# Altium PCB PS-25-001-E-01.PcbDoc (part 3 of 3)
Units mm, origin at the board's own origin, x right, y up, seen from the top; angles counter-clockwise.
Board outline 120 x 60 mm, 4 copper layers (01_Top, 02_Plane, 03_Plane, 04_Bottom), stack 1.578 mm thick; 526 components, 249 nets, 1738 pads, 748 vias.
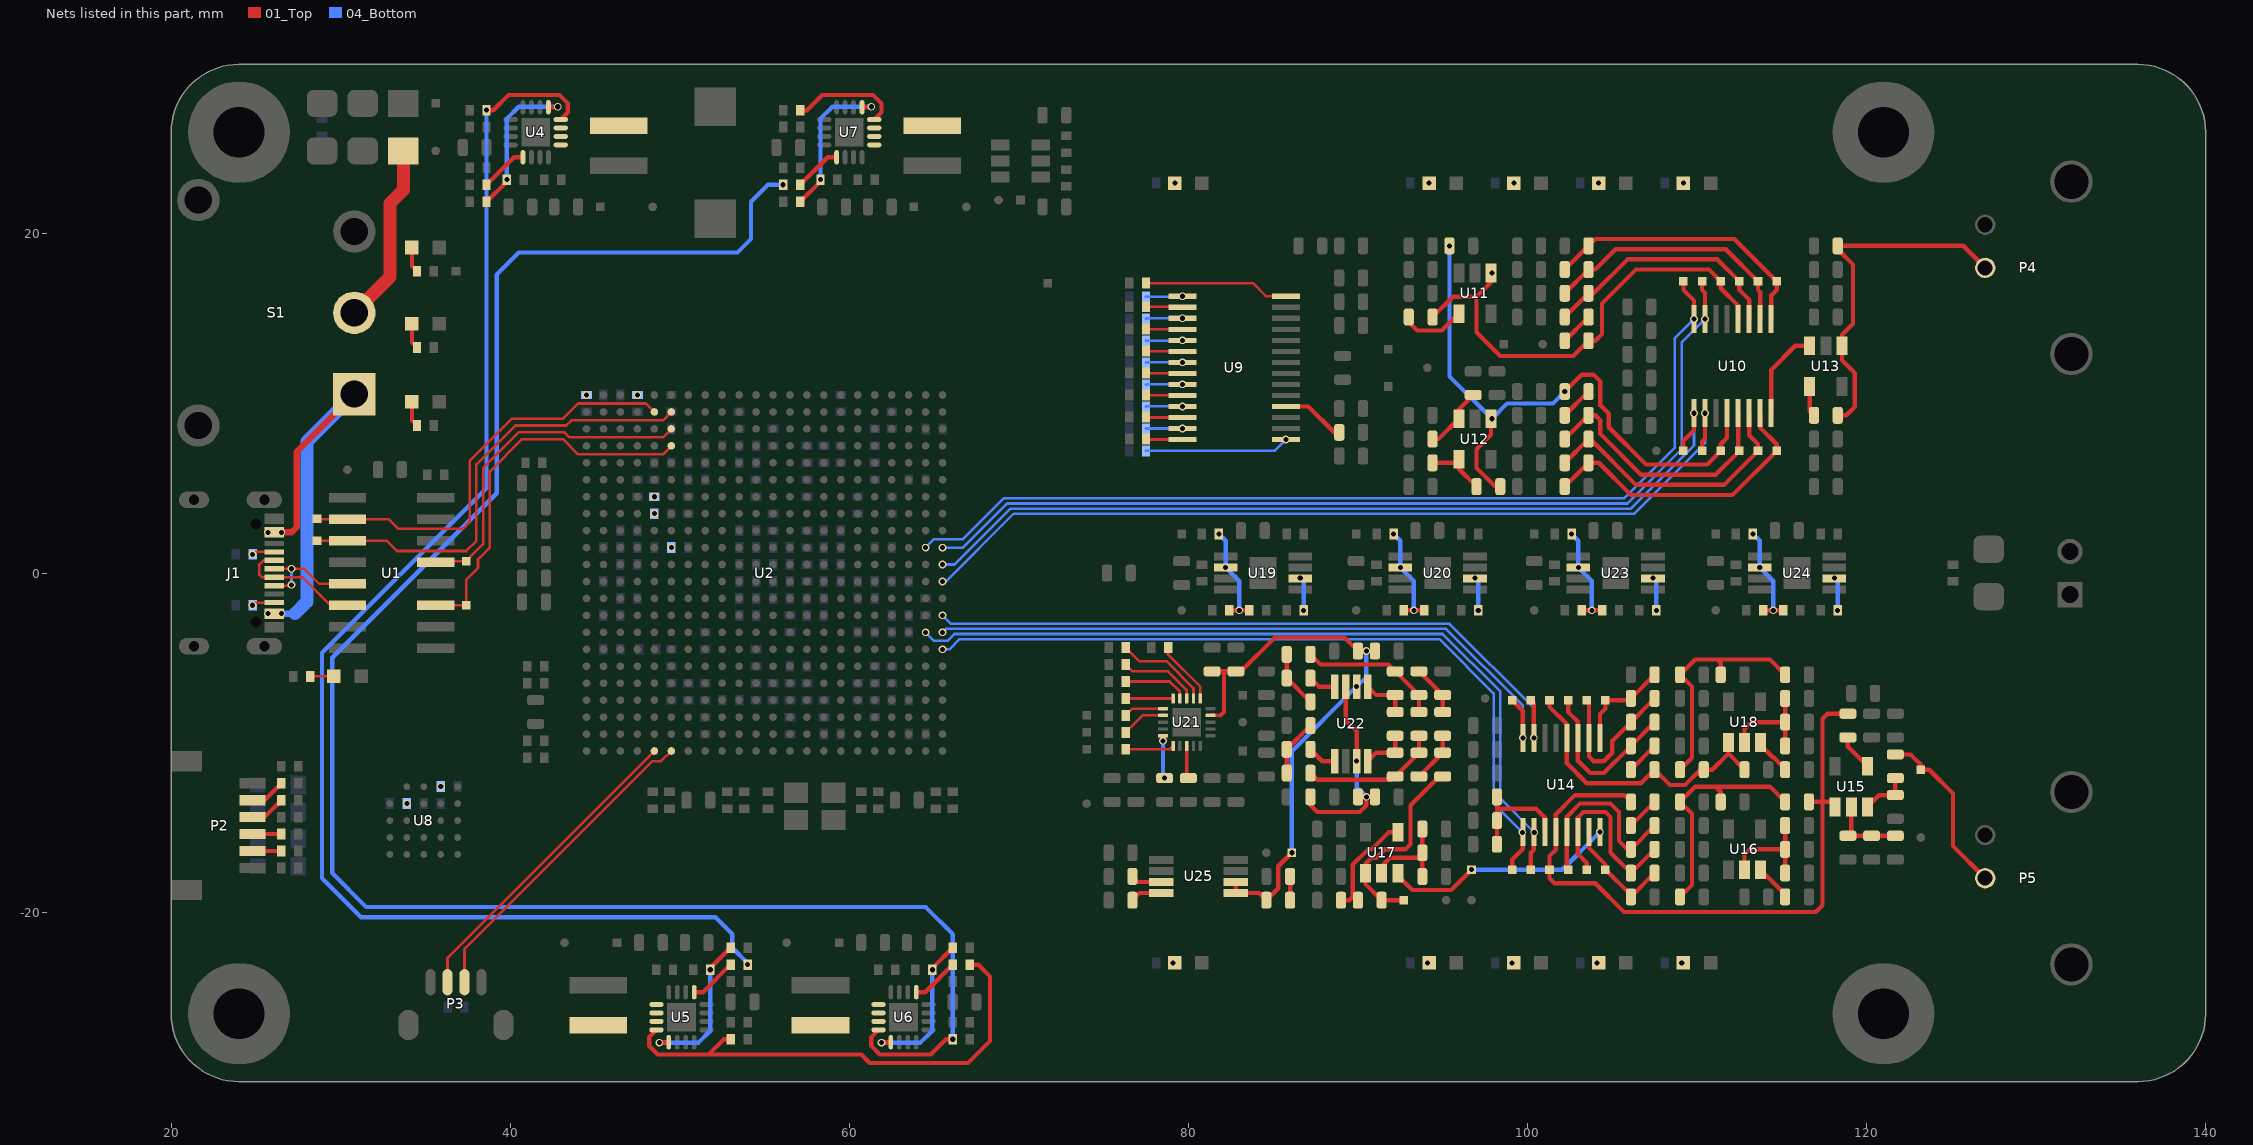
[diagram p5: the nets of this part, all layers, seen from the top]

## Via types
v1: diameter 0.45, hole 0.3, 01_Top to 04_Bottom, tented both sides, 728 vias
v2: diameter 0.4, hole 0.3, 01_Top to 04_Bottom, tented bottom, 20 vias

## Nets (pads, with @x,y where several pads share a name; then routed paths per layer and width w, separated by ;. In a path a pad name is that pad's centre, name@x,y a point inside that pad or via, vN(x,y) a via of type N, cw(c..) or ccw(c..) an arc to the next point about the centre after c; other vN are vias at no path point) (continued)
NetC177_2: C177.2 C178.1 R110.1 U14.3 | length 6.7
  01_Top w0.254: R110.1@98.2,-16 C178.1@98.2,-14.6 98.2,-13.9 ; C177.2@98.2,-13.2 98.2,-13.9 ; U14.3@101.025,-15.275 101.025,-14.425 100.5,-13.9 98.2,-13.9
NetC180_2: C180.2 R101.2 R111.1 R112.2 | length 14.1
  01_Top w0.254: R101.2@109,-19.1 109.7,-18.4 109.7,-14.2 C180.2@109,-13.5 109.9,-12.6 111.1,-12.6 ; R112.2@111.4,-13.5 111.4,-12.9 111.1,-12.6 ; R111.1@115.2,-13.5 114.3,-12.6 111.1,-12.6
NetC181_1: C181.1 R114.1 U15.3 | length 2.9
  01_Top w0.254: U15.3@120.05,-13.8 120.75,-13.1 C181.1@121.7,-13.1 R114.1@121.7,-12.1
NetC182_2: C182.2 R103.2 R116.1 R117.2 | length 14.1
  01_Top w0.254: R103.2@109,-11.6 109.7,-10.9 109.7,-6.7 C182.2@109,-6 109.9,-5.1 111.2,-5.1 ; R117.2@111.4,-6 111.4,-5.3 111.2,-5.1 ; R116.1@115.2,-6 114.3,-5.1 111.2,-5.1
NetC183_2: C183.2 C186.1 R127.2 U15.2 | length 4.6
  01_Top w0.254: U15.2@119.1,-13.8 119.1,-15.3 C183.2@118.9,-15.5 C186.1@120.3,-15.5 R127.2@121.7,-15.5
NetC184_2: C184.2 C188.1 R130.2 U17.2 | length 5.9
  01_Top w0.254: U17.2@91.4,-17.7 91.4,-17.3 91.9,-16.8 93.5,-16.8 C188.1@93.8,-16.5 ; C184.2@93.8,-17.9 C188.1@93.8,-16.5 ; R130.2@93.8,-15.1 C188.1@93.8,-16.5
NetC185_2: C185.2 C189.1 R129.2 U16.2 | length 6.2
  01_Top w0.254: U16.2@112.8,-17.5 112.8,-16.6 113.1,-16.3 C185.2@115.2,-16.3 ; C189.1@115.2,-17.7 C185.2@115.2,-16.3 ; R129.2@115.2,-14.9 C185.2@115.2,-16.3
NetC187_2: C187.2 C190.1 R132.2 U18.2 | length 6.2
  01_Top w0.254: U18.2@112.8,-10 112.8,-9.2 113.2,-8.8 C187.2@115.2,-8.8 ; C190.1@115.2,-10.2 C187.2@115.2,-8.8 ; R132.2@115.2,-7.4 C187.2@115.2,-8.8
NetC191_1: C191.1 C192.1 R134.2 U22.3 U22.7 | length 12.7
  01_Top w0.254: R134.2@87.2,-13.2 87.2,-13.7 87.6,-14.1 90.1,-14.1 90.5,-13.7 v1(90.5,-13.2) ; U22.3@89.275,-6.7 89.275,-8.675 89.925,-9.325 v1(89.925,-11.1) ; C191.1@89.925,-13.125 C191.1@90,-13.2 v1(90.5,-13.2) ; C192.1@91,-13.2 v1(90.5,-13.2)
  04_Bottom w0.254: v1(89.925,-11.1) 89.925,-12.625 v1(90.5,-13.2)
NetC202_1: C202.1 R140.1 R142.2 U19.2 | length 6.2
  01_Top w0.254: R140.1@82.4,-2.2 R142.2@83.6,-2.2
  04_Bottom w0.254: v1(81.8,2.3) 82.2,1.9 v1(82.2,0.325) 83,-0.475 v1(83,-2.2)
NetC203_1: C203.1 R141.1 R143.2 U20.2 | length 6.2
  01_Top w0.254: R141.1@92.7,-2.2 R143.2@93.9,-2.2
  04_Bottom w0.254: v1(92.1,2.3) 92.5,1.9 v1(92.5,0.325) 93.3,-0.475 v1(93.3,-2.2)
NetC204_1: C204.1 R135.2 R136.1 | length 3
  01_Top w0.254: R136.1@93.6,-5.8 R135.2@95,-7.2 C204.1@95,-8.2
NetC204_2: C204.2 R146.2 R147.1 | length 3
  01_Top w0.254: R147.1@93.6,-12 R146.2@95,-10.6 C204.2@95,-9.6
NetC205_1: C205.1 R133.1 R136.2 R137.1 | length 8.4
  01_Top w0.254: R133.1@87.2,-4.8 87.8,-5.4 91.8,-5.4 R136.2@93.6,-7.2 C205.1@93.6,-8.2
NetC205_2: C205.2 R147.2 R148.1 R149.1 | length 8.2
  01_Top w0.254: R149.1@87.2,-11.8 87.6,-12.2 92,-12.2 R148.1@92.2,-12 R147.2@93.6,-10.6 C205.2@93.6,-9.6
NetC206_1: C206.1 R137.2 U22.1 | length 2.8
  01_Top w0.254: U22.1@90.575,-6.7 91.075,-7.2 R137.2@92.2,-7.2 C206.1@92.2,-8.2
NetC206_2: C206.2 R148.2 U22.8 | length 2.8
  01_Top w0.254: U22.8@90.575,-11.1 91.075,-10.6 R148.2@92.2,-10.6 C206.2@92.2,-9.6
NetC211_2: C211.2 U19.6 | length 2
  01_Top w0.254: U19.6@86.6,-0.325 v1(86.6,-0.3)
  04_Bottom w0.254: v1(86.6,-0.3) 86.8,-0.5 v1(86.8,-2.2)
NetC212_2: C212.2 U20.6 | length 2
  01_Top w0.254: U20.6@96.9,-0.325 v1(96.9,-0.3)
  04_Bottom w0.254: v1(96.9,-0.3) 97.1,-0.5 v1(97.1,-2.2)
NetC217_2: C217.2 U21.18 | length 1.9
  01_Top w0.203: C217.2@79.9,-12 U21.18@79.9,-10.2
  01_Top w0.254: C217.2@79.9,-12 C217.2@80,-12.1
NetC218_2: C218.2 U21.15 | length 2.5
  01_Top w0.203: v1(78.5,-9.9) U21.15@78.5,-9.6
  04_Bottom w0.254: v1(78.5,-9.9) 78.5,-12 v1(78.6,-12.1)
NetC227_1: C227.1 R154.1 R158.2 U23.2 | length 6.2
  01_Top w0.254: R154.1@103.2,-2.2 R158.2@104.4,-2.2
  04_Bottom w0.254: v1(102.6,2.3) 103,1.9 v1(103,0.325) 103.8,-0.475 v1(103.8,-2.2)
NetC228_1: C228.1 R155.1 R159.2 U24.2 | length 6.2
  01_Top w0.254: R155.1@113.9,-2.2 R159.2@115.1,-2.2
  04_Bottom w0.254: v1(113.3,2.3) 113.7,1.9 v1(113.7,0.325) 114.5,-0.475 v1(114.5,-2.2)
NetC231_2: C231.2 U23.6 | length 2
  01_Top w0.254: U23.6@107.4,-0.325 v1(107.4,-0.3)
  04_Bottom w0.254: v1(107.4,-0.3) 107.6,-0.5 v1(107.6,-2.2)
NetC232_2: C232.2 U24.6 | length 2
  01_Top w0.254: U24.6@118.1,-0.325 v1(118.1,-0.3)
  04_Bottom w0.254: v1(118.1,-0.3) 118.3,-0.5 v1(118.3,-2.2)
NetC233_1: C233.1 R162.1 | length 1.4
  01_Top w0.254: R162.1@86,-19.3 C233.1@86,-17.9
NetC235_1: C235.1 U25.4 | length 1.9
  01_Top w0.254: C235.1@76.7,-19.3 77.125,-18.875 U25.4@78.4,-18.875
NetD1_1: D1.1 R8.1 | length 1.5
  01_Top w0.254: D1.1@34.2,10.1 34.2,9 R8.1@34.5,8.7
NetD2_1: D2.1 R6.1
  other v1: 79.2,23
NetD3_1: D3.1 R7.1
  other v1: 79.1,-23
NetD4_1: D4.1 R10.1
  other v1: 94.2,23
NetD5_1: D5.1 R11.1
  other v1: 94.1,-23
NetD6_1: D6.1 R13.1 | length 1.4
  01_Top w0.152: R13.1@28.2,-6.1 D6.1@29.6,-6.1
NetD7_1: D7.1 R14.1
  other v1: 99.2,23
NetD8_1: D8.1 R15.1
  other v1: 99.1,-23
NetD9_1: D9.1 R16.1 | length 1.5
  01_Top w0.254: D9.1@34.2,14.7 34.2,13.6 R16.1@34.5,13.3
NetD10_1: D10.1 R17.1
  other v1: 104.2,23
NetD11_1: D11.1 R18.1
  other v1: 104.1,-23
NetD12_1: D12.1 R22.1 | length 1.5
  01_Top w0.254: D12.1@34.2,19.2 34.2,18.1 R22.1@34.5,17.8
NetD13_1: D13.1 R20.1
  other v1: 109.2,23
NetD14_1: D14.1 R21.1
  other v1: 109.1,-23
NetF1_1: F1.1 S1.2 | length 10.8
  01_Top w0.762: S1.2@30.8,15.35 32.9,17.45 32.9,21.8 33.7,22.6 F1.1@33.7,24.9
NetJ1_A5: J1.A5 R1.1 | length 1.3
  01_Top w0.152: v1(24.8,1.1) 24.95,1.25 J1.A5@26.075,1.25
NetJ1_B5: J1.B5 R2.2 | length 1.3
  01_Top w0.152: v1(24.8,-1.9) 24.95,-1.75 J1.B5@26.075,-1.75
NetL1_1: L1.1 U4.1 U4.2 U4.3
NetL2_1: L2.1 U5.1 U5.2 U5.3
NetL3_1: L3.1 U6.1 U6.2 U6.3
NetL4_1: L4.1 U7.1 U7.2 U7.3
NetP2_2: P2.2 R27.1 | length 2.1
  01_Top w0.254: P2.2@24.8,-13.4 25.5,-13.4 R27.1@26.5,-12.4
NetP2_3: P2.3 R28.1 | length 2.1
  01_Top w0.254: P2.3@24.8,-14.4 25.5,-14.4 R28.1@26.5,-13.4
NetP2_4: P2.4 R29.1 | length 1.7
  01_Top w0.254: P2.4@24.8,-15.4 R29.1@26.5,-15.4
NetP2_5: P2.5 R30.1 | length 1.7
  01_Top w0.254: P2.5@24.8,-16.4 R30.1@26.5,-16.4
NetR5_1: R5.1 R12.2 U4.5 | length 9.2
  01_Top w0.254: R12.2@38.6,21.9 39.8,23.1 v1(39.8,23.2) ; U4.5@42.25,27.475 42.775,27.475 v1(42.8,27.5)
  04_Bottom w0.254: v1(39.8,23.2) 39.8,26.8 40.5,27.5 v1(42.8,27.5)
NetR9_2: R9.2 U4.13 | length 2.8
  01_Top w0.254: R9.2@38.6,22.9 40.225,24.525 U4.13@40.75,24.525
NetR24_1: R24.1 R26.2 U5.5 | length 9.2
  01_Top w0.254: v1(48.8,-27.7) 48.825,-27.675 U5.5@49.35,-27.675 ; v1(51.8,-23.4) 51.8,-23.3 R26.2@53,-22.1
  04_Bottom w0.254: v1(48.8,-27.7) 51.1,-27.7 51.8,-27 v1(51.8,-23.4)
NetR25_2: R25.2 U5.13 | length 2.8
  01_Top w0.254: U5.13@50.85,-24.725 51.375,-24.725 R25.2@53,-23.1
NetR33_1: R33.1 R35.2 U6.5 | length 9.2
  01_Top w0.254: v1(61.9,-27.7) 61.925,-27.675 U6.5@62.45,-27.675 ; v1(64.9,-23.4) 64.9,-23.3 R35.2@66.1,-22.1
  04_Bottom w0.254: v1(61.9,-27.7) 64.2,-27.7 64.9,-27 v1(64.9,-23.4)
NetR34_2: R34.2 U6.13 | length 2.8
  01_Top w0.254: U6.13@63.95,-24.725 64.475,-24.725 R34.2@66.1,-23.1
NetR36_1: R36.1 U2.K6
  other v1: 49.5,1.5
NetR37_1: R37.1 U2.H5
  other v1: 48.5,3.5
NetR38_1: R38.1 U2.A4
  other v1: 47.5,10.5
NetR39_1: R39.1 U2.G5
  other v1: 48.5,4.5
NetR45_1: R45.1 R50.2 U7.5 | length 9.2
  01_Top w0.254: R50.2@57.1,21.9 58.3,23.1 v1(58.3,23.2) ; U7.5@60.75,27.475 61.275,27.475 v1(61.3,27.5)
  04_Bottom w0.254: v1(58.3,23.2) 58.3,26.8 59,27.5 v1(61.3,27.5)
NetR46_2: R46.2 U7.13 | length 2.8
  01_Top w0.254: R46.2@57.1,22.9 58.725,24.525 U7.13@59.25,24.525
NetR47_2: R47.2 U8.B2
  other v1: 33.9,-13.6
NetR49_2: R49.2 U8.A4
  other v1: 35.9,-12.6
NetR55_2: R55.2 U2.A1
  other v1: 44.5,10.5
NetR56_2: R56.2 U11.4 | length 3.9
  01_Top w0.254: R56.2@93,15.1 93,14.8 93.5,14.3 94.95,14.3 U11.4@95.95,15.3
NetR58_2: R58.2 R69.2 U12.4 | length 3.7
  01_Top w0.254: R69.2@94.4,6.5 95.75,6.5 U12.4@95.95,6.7 95.95,6.15 R58.2@97,5.1
NetR59_2: R59.2 U13.4 | length 1.8
  01_Top w0.254: U13.4@116.65,11 116.65,9.55 R59.2@116.9,9.3
NetR61_1: R61.1 U9.15 | length 8.5
  04_Bottom w0.152: R61.1@77.5,7.2 85.075,7.2 v1(85.75,7.875)
NetR64_1: R64.1 U9.28 | length 8.6
  01_Top w0.152: R64.1@77.5,17.1 83.8,17.1 84.575,16.325 U9.28@85.75,16.325
NetR65_1: R65.1 U9.14 | length 2.2
  01_Top w0.152: R65.1@77.5,7.9 77.525,7.875 U9.14@79.65,7.875
NetR67_1: R67.1 U9.13 | length 2.2
  04_Bottom w0.152: R67.1@77.5,8.5 77.525,8.525 v1(79.65,8.525)
NetR68_1: R68.1 U9.12 | length 2.2
  01_Top w0.152: R68.1@77.5,9.2 77.525,9.175 U9.12@79.65,9.175
NetR70_1: R70.1 U9.11 | length 2.2
  04_Bottom w0.152: R70.1@77.5,9.8 77.525,9.825 v1(79.65,9.825)
NetR71_1: R71.1 U9.10 | length 2.2
  01_Top w0.152: R71.1@77.5,10.5 77.525,10.475 U9.10@79.65,10.475
NetR73_2: R73.2 R76.2 | length 2
  01_Top w0.254: R73.2@102.2,13.7 R76.2@103.6,15.1
NetR74_2: R74.2 R80.2 U12.3 | length 3.8
  01_Top w0.254: R74.2@94.4,7.9 94.75,7.9 U12.3@95.95,9.1 95.95,9.65 R80.2@96.8,10.5
NetR75_1: R75.1 U9.9 | length 2.2
  04_Bottom w0.152: R75.1@77.5,11.1 77.525,11.125 v1(79.65,11.125)
NetR78_1: R78.1 U9.8 | length 2.2
  01_Top w0.152: R78.1@77.5,11.8 77.525,11.775 U9.8@79.65,11.775
NetR81_1: R81.1 U9.7 | length 2.2
  04_Bottom w0.152: R81.1@77.5,12.4 77.525,12.425 v1(79.65,12.425)
NetR82_2: R82.2 R85.2 | length 2
  01_Top w0.254: R85.2@102.2,9.3 R82.2@103.6,10.7
NetR84_1: R84.1 U9.6 | length 2.2
  01_Top w0.152: R84.1@77.5,13.1 77.525,13.075 U9.6@79.65,13.075
NetR87_1: R87.1 U9.18 | length 3.8
  01_Top w0.254: U9.18@85.75,9.825 87.075,9.825 88.6,8.3 R87.1@88.9,8.3
NetR91_1: R91.1 U9.5 | length 2.2
  04_Bottom w0.152: R91.1@77.5,13.7 79.625,13.7 v1(79.65,13.725)
NetR95_1: R95.1 U9.4 | length 2.2
  01_Top w0.152: R95.1@77.5,14.4 77.525,14.375 U9.4@79.65,14.375
NetR97_1: R97.1 U9.3 | length 2.2
  04_Bottom w0.152: R97.1@77.5,15 77.525,15.025 v1(79.65,15.025)
NetR99_1: R99.1 U9.2 | length 2.2
  01_Top w0.152: R99.1@77.5,15.7 79.625,15.7 U9.2@79.65,15.675
NetR100_1: R100.1 U9.1 | length 2.2
  04_Bottom w0.152: R100.1@77.5,16.3 79.625,16.3 v1(79.65,16.325)
NetR102_2: R102.2 U15.4 | length 2.2
  01_Top w0.254: R102.2@118.9,-9.7 118.9,-10.25 U15.4@120.05,-11.4
NetR105_2: R105.2 R113.1 U17.4 | length 6.1
  01_Top w0.254: R113.1@89,-19.3 89.5,-19.3 89.7,-19.1 89.7,-17.2 90.6,-16.3 90.8,-16.3 91.8,-15.3 U17.4@92.35,-15.3
NetR115_2: R115.2 R118.2 | length 2
  01_Top w0.254: R118.2@106.1,-14.9 R115.2@107.5,-13.5
NetR120_2: R120.2 R123.2 | length 2
  01_Top w0.254: R120.2@106.1,-11.6 R123.2@107.5,-10.2
NetR121_1: R121.1 U16.3 | length 2.2
  01_Top w0.254: U16.3@113.75,-17.5 115.2,-18.95 R121.1@115.2,-19.1
NetR124_1: R124.1 U18.3 | length 2.2
  01_Top w0.254: U18.3@113.75,-10 113.75,-10.15 114.471,-10.871 114.507,-10.871 115.2,-11.565 R124.1@115.2,-11.6
NetR133_2: R133.2 R138.2 R139.1 | length 3.4
  01_Top w0.254: R133.2@85.8,-4.8 R138.2@85.8,-6.2 R139.1@87.2,-7.6
NetR138_1: R138.1 U22.4 | length 1.6
  01_Top w0.254: R138.1@87.2,-6.2 87.7,-6.7 U22.4@88.625,-6.7
NetR144_1: R144.1 U22.5 | length 1.7
  01_Top w0.254: R144.1@87.2,-10.4 87.9,-11.1 U22.5@88.625,-11.1
NetR144_2: R144.2 R145.1 R149.2 | length 3.4
  01_Top w0.254: R149.2@85.8,-11.8 R144.2@85.8,-10.4 R145.1@87.2,-9
NetR150_2: R150.2 U21.16 | length 2.9
  01_Top w0.152: R150.2@76.3,-10.4 76.303,-10.403 78.897,-10.403 U21.16@79.1,-10.2
NetR151_2: R151.2 U21.12 | length 2.6
  01_Top w0.152: R151.2@76.3,-9.4 77.3,-8.4 U21.12@78.5,-8.4
NetR152_2: R152.2 U21.11 | length 2.4
  01_Top w0.152: R152.2@76.3,-8.4 76.7,-8 U21.11@78.5,-8
NetR153_2: R153.2 U21.10 | length 2.8
  01_Top w0.152: R153.2@76.3,-7.4 U21.10@79.1,-7.4
NetR156_2: R156.2 U21.9 | length 3.8
  01_Top w0.152: R156.2@76.3,-6.4 78.9,-6.4 79.5,-7 U21.9@79.5,-7.4
NetR157_2: R157.2 U21.8 | length 4.7
  01_Top w0.152: R157.2@76.3,-5.4 76.7,-5.8 78.8,-5.8 79.9,-6.9 U21.8@79.9,-7.4
NetR160_2: R160.2 U21.7 | length 5.6
  01_Top w0.152: R160.2@76.3,-4.4 77.1,-5.2 78.7,-5.2 80.3,-6.8 U21.7@80.3,-7.4
NetR161_2: R161.2 U21.6 | length 3.8
  01_Top w0.152: R161.2@78.8,-4.4 78.8,-4.8 80.7,-6.7 U21.6@80.7,-7.4
NetR163_2: R163.2 U25.3 | length 1.8
  01_Top w0.254: R163.2@76.7,-17.9 77.025,-18.225 U25.3@78.4,-18.225
POK_1V1: R3.2 R25.1 U4.4 | length 83.6
  01_Top w0.254: v1(38.6,27.3) 39,27.3 39.9,28.2 42.9,28.2 43.4,27.7 43.4,27.175 U4.4@42.975,26.75
  04_Bottom w0.254: v1(38.6,27.3) 38.6,5 28.9,-4.7 28.9,-18 31.2,-20.3 52.1,-20.3 53.1,-21.3 53.1,-22.1 54,-23 v1(54,-23.1)
POK_1V8: R19.2 R34.1 U5.4 | length 29
  01_Top w0.254: U5.4@48.625,-26.95 48.2,-27.375 48.2,-27.9 48.7,-28.4 51.7,-28.4 ; R19.2@53,-27.5 52.6,-27.5 51.7,-28.4 ; R34.1@67.2,-23.1 67.6,-23.1 68.3,-23.8 68.3,-27.6 67,-28.9 61.2,-28.9 60.7,-28.4 51.7,-28.4
POK_2V5: R31.2 R46.1 U6.4 | length 110.5
  01_Top w0.254: U6.4@61.725,-26.95 61.3,-27.375 61.3,-27.9 61.8,-28.4 64.8,-28.4 65.7,-27.5 v1(66.1,-27.5)
  04_Bottom w0.254: v1(56.1,22.9) 55.2,22.9 54.2,21.9 54.2,19.7 53.4,18.9 40.5,18.9 39.2,17.6 39.2,4.7 29.5,-5 29.5,-17.7 31.5,-19.7 64.5,-19.7 66.1,-21.3 v1(66.1,-27.5)
POK_3V3: R42.2 U7.4 | length 6.5
  01_Top w0.254: R42.2@57.1,27.3 57.5,27.3 58.4,28.2 61.4,28.2 61.9,27.7 61.9,27.175 U7.4@61.475,26.75
R2V5: C213.1 C214.1 C229.1 C230.1 R162.2 TP66.1 U21.4 U22.2 U25.5 U25.6 | length 32.8
  01_Top w0.203: U21.4@81.3,-8.4 81.9,-8.4
  01_Top w0.254: C229.1@81.4,-5.8 82.1,-5.8 ; 81.9,-8.4 82.1,-8.2 82.1,-5.8 ; U25.6@82.8,-18.225 U25.5@82.8,-18.875 84.175,-18.875 R162.2@84.6,-19.3 85.3,-18.6 85.3,-17.3 v1(86.1,-16.5) ; C214.1@90,-4.6 89.2,-3.8 85.1,-3.8 83.1,-5.8 C230.1@82.8,-5.8 82.1,-5.8
  04_Bottom w0.254: v1(86.1,-16.5) 86.1,-10.525 v1(89.925,-6.7) 90.5,-6.125 v1(90.5,-4.6)
RX_AMP: R105.1 R146.1 TP48.1 U17.1 | length 11.9
  01_Top w0.254: TP48.1@92.7,-19.3 R105.1@91.4,-19.3 90.45,-18.35 U17.1@90.45,-17.7 90.45,-17.15 90.8,-16.8 91.1,-16.8 91.6,-16.3 92.8,-16.3 93.1,-16 93.1,-13.7 94.8,-12 R146.1@95,-12
RX_DIV1: R102.1 R111.2 R115.1 TP41.1 U14.4 U15.1 | length 40.4
  01_Top w0.254: R115.1@106.1,-13.5 105.7,-13.1 102.8,-13.1 101.675,-14.225 U14.4@101.675,-15.275 101.675,-16.325 101.3,-16.7 TP41.1@101.3,-17.5 101.3,-18 101.6,-18.3 104,-18.3 105.7,-20 117,-20 117.4,-19.6 117.4,-13.5 ; R111.2@116.6,-13.5 117.4,-13.5 ; U15.1@118.15,-13.8 117.85,-13.5 117.4,-13.5 ; R102.1@118.9,-8.3 117.7,-8.3 117.4,-8.6 117.4,-13.5
RX_DIV1F: C167.2 R103.1 R120.1 TP46.1 U14.12 U18.1 | length 17
  01_Top w0.254: TP46.1@101.3,-7.5 101.3,-7.9 102.325,-8.925 U14.12@102.325,-9.725 102.325,-11.225 103.5,-12.4 106.7,-12.4 R120.1@107.5,-11.6 108.4,-12.5 109.3,-12.5 110.2,-11.6 R103.1@110.4,-11.6 110.9,-11.6 111.85,-10.65 C167.2@112.8,-11.6
RX_DIV2: R118.1 R119.1 TP42.1 U14.5 | length 11.3
  01_Top w0.254: TP42.1@102.4,-17.5 102.325,-17.425 U14.5@102.325,-15.275 102.325,-14.375 103.1,-13.6 104.9,-13.6 105.4,-14.1 105.4,-15.8 105.9,-16.3 R119.1@106.1,-16.3 R118.1@107.5,-14.9
RX_DIV2F: R123.1 R126.1 TP47.1 U14.11 | length 9.9
  01_Top w0.254: TP47.1@102.4,-7.5 102.4,-8.2 102.975,-8.775 U14.11@102.975,-9.725 102.975,-11.075 103.7,-11.8 104.5,-11.8 R123.1@106.1,-10.2 R126.1@107.5,-8.8
RX_DIV4: R119.2 R122.2 TP43.1 U14.6 | length 11.3
  01_Top w0.254: TP43.1@103.5,-17.5 103.5,-17.1 102.975,-16.575 U14.6@102.975,-15.275 102.975,-14.425 103.3,-14.1 104.6,-14.1 104.9,-14.4 104.9,-16.5 R122.2@106.1,-17.7 R119.2@107.5,-16.3
RX_DIV4F: R126.2 R128.2 TP49.1 U14.10 | length 9.3
  01_Top w0.254: TP49.1@103.5,-7.5 103.625,-7.625 U14.10@103.625,-9.725 103.625,-10.825 103.9,-11.1 104.5,-11.1 105,-10.6 105,-9.9 R126.2@106.1,-8.8 R128.2@107.5,-7.4
RX_DIV8: R122.1 R125.1 TP44.1 U14.7 | length 6.8
  01_Top w0.254: U14.7@103.625,-15.275 103.625,-16.225 104.6,-17.2 TP44.1@104.6,-17.5 106.1,-19 R125.1@106.1,-19.1 R122.1@107.5,-17.7
RX_DIV8F: R128.1 R131.1 TP50.1 U14.9 | length 5.9
  01_Top w0.254: U14.9@104.275,-9.725 104.275,-8.325 104.6,-8 TP50.1@104.6,-7.5 106,-7.5 R128.1@106.1,-7.4 R131.1@107.5,-6
RX_IN: P5.1 R114.2 TP45.1 | length 10.3
  01_Top w0.254: R114.2@121.7,-10.7 122.6,-10.7 123.2,-11.3 TP45.1@123.2,-11.6 123.7,-11.6 125.1,-13 125.1,-16.1 P5.1@127,-18
RX_MUX_A0: TP38.1 U2.T22 U14.1 | length 45.5
  01_Top w0.254: TP38.1@99.1,-17.5 99.1,-16.9 99.725,-16.275 U14.1@99.725,-15.275
  04_Bottom w0.152: v1(65.5,-4.5) 65.9,-4.5 66.5,-3.9 94.8,-3.9 98,-7.1 98,-13.6 v1(99.7,-15.3)
RX_MUX_A1: TP39.1 U2.R22 U14.16 | length 40.6
  01_Top w0.254: TP39.1@99.1,-7.5 99.725,-8.125 v1(99.725,-9.725)
  04_Bottom w0.152: v1(65.5,-3.5) 65.7,-3.3 95.2,-3.3 99.725,-7.825 v1(99.725,-9.725)
RX_MUX_A2: TP40.1 U2.P22 U14.15 | length 41.2
  01_Top w0.254: TP40.1@100.2,-7.5 100.375,-7.675 v1(100.375,-9.725)
  04_Bottom w0.152: v1(65.5,-2.5) 66,-3 95.4,-3 100.375,-7.975 v1(100.375,-9.725)
RX_MUX_EN: TP37.1 U2.R21 U14.2 | length 47.1
  01_Top w0.254: TP37.1@100.2,-17.5 100.2,-16.5 100.375,-16.325 U14.2@100.375,-15.275
  04_Bottom w0.152: v1(64.5,-3.5) 65,-4 65.8,-4 66.2,-3.6 95,-3.6 98.4,-7 98.4,-13.3 v1(100.4,-15.3)
RX_MUX_OUT: TP26.1 U14.8 U17.3 | length 13.8
  01_Top w0.254: U17.3@92.35,-17.7 92.35,-17.85 93.2,-18.7 95.5,-18.7 v1(96.7,-17.5)
  04_Bottom w0.254: v1(96.7,-17.5) 102.05,-17.5 v1(104.275,-15.275)
TMP_SCL: P3.3 U2.AB5 | length 18.7
  01_Top w0.152: P3.3@36.3,-24.137 36.3,-22.7 U2.AB5@48.5,-10.5
TMP_SDA: P3.2 U2.AB6 | length 19
  01_Top w0.152: P3.2@37.3,-24.137 37.3,-22.181 48.381,-11.1 48.9,-11.1 U2.AB6@49.5,-10.5
TX_DIV1: R58.1 R72.2 R82.1 TP21.1 U10.4 U12.1 | length 37.1
  01_Top w0.254: U12.1@97.85,9.1 97.85,8.15 97,7.3 97,6.2 98.1,5.1 R58.1@98.4,5.1 ; v1(102.2,10.7) 103.2,11.7 103.9,11.7 104.3,11.3 104.3,9.9 104.8,9.4 104.8,8.6 107,6.4 110.6,6.4 TP21.1@111.4,7.2 111.4,7.6 111.775,7.975 U10.4@111.775,9.425
  04_Bottom w0.254: v1(95.4,19.3) 95.4,11.6 v1(97.9,9.1) 98.8,10 101.5,10 v1(102.2,10.7)
TX_DIV1F: R56.1 R73.1 TP28.1 U10.12 U11.1 | length 28
  01_Top w0.254: R56.1@94.4,15.1 95.6,16.3 97,16.3 ; U11.1@97.85,17.7 97.85,17.15 97,16.3 ; U10.12@112.425,14.975 112.425,15.775 111.4,16.8 TP28.1@111.4,17.2 110.7,17.9 106.4,17.9 104.4,15.9 104.4,14.1 104,13.7 R73.1@103.6,13.7 102.7,12.8 98.4,12.8 97,14.2 97,16.3
  other v1: 97.9,17.7
TX_DIV2: R85.1 R92.1 TP23.1 U10.5 | length 15.6
  01_Top w0.254: R92.1@102.2,7.9 R85.1@103.6,9.3 104,9.3 104.3,9 104.3,8.2 106.7,5.8 111.1,5.8 TP23.1@112.5,7.2 112.425,7.275 U10.5@112.425,9.425
TX_DIV2F: R76.1 R79.1 TP29.1 U10.11 | length 14.7
  01_Top w0.254: R76.1@102.2,15.1 R79.1@103.6,16.5 103.9,16.5 105.9,18.5 111.2,18.5 TP29.1@112.5,17.2 112.5,16.7 113.075,16.125 U10.11@113.075,14.975
TX_DIV4: R92.2 R96.2 TP24.1 U10.6 | length 16.4
  01_Top w0.254: R96.2@102.2,6.5 R92.2@103.6,7.9 103.7,7.9 106.4,5.2 111.6,5.2 TP24.1@113.6,7.2 113.6,7.6 113.075,8.125 U10.6@113.075,9.425
TX_DIV4F: R79.2 R83.2 TP30.1 U10.10 | length 15.5
  01_Top w0.254: R79.2@102.2,16.5 R83.2@103.6,17.9 104,17.9 105.2,19.1 111.7,19.1 TP30.1@113.6,17.2 113.6,16.7 113.725,16.575 U10.10@113.725,14.975
TX_DIV8: R96.1 R98.1 TP25.1 U10.7 | length 17.6
  01_Top w0.254: R98.1@102.2,5.1 R96.1@103.6,6.5 104.2,6.5 106.1,4.6 112.1,4.6 TP25.1@114.7,7.2 114.7,7.6 113.725,8.575 U10.7@113.725,9.425
TX_DIV8F: R83.1 R86.1 TP31.1 U10.9 | length 16.6
  01_Top w0.254: R83.1@102.2,17.9 R86.1@103.6,19.3 104,19.7 112.2,19.7 TP31.1@114.7,17.2 114.7,16.7 114.375,16.375 U10.9@114.375,14.975
TX_MUX_A0: TP18.1 U2.L22 U10.1 | length 51.6
  01_Top w0.254: TP18.1@109.2,7.2 109.2,7.8 109.825,8.425 v1(109.825,9.425)
  04_Bottom w0.152: v1(65.5,0.5) 66.2,0.5 69.5,3.8 106.1,3.8 109.825,7.525 v1(109.825,9.425)
TX_MUX_A1: TP19.1 U2.K21 U10.16 | length 57.2
  01_Top w0.254: TP19.1@109.2,17.2 109.2,16.7 109.825,16.075 v1(109.825,14.975)
  04_Bottom w0.152: v1(64.5,1.5) 65,2 66.7,2 69.1,4.4 105.7,4.4 108.7,7.4 108.7,13.85 v1(109.825,14.975)
TX_MUX_A2: TP20.1 U2.K22 U10.15 | length 56.5
  01_Top w0.254: TP20.1@110.3,17.2 110.3,16.7 110.475,16.525 v1(110.475,14.975)
  04_Bottom w0.152: v1(65.5,1.5) 66.7,1.5 69.3,4.1 105.9,4.1 109.1,7.3 109.1,13.6 v1(110.475,14.975)
TX_MUX_EN: TP17.1 U2.M22 U10.2 | length 52.4
  01_Top w0.254: TP17.1@110.3,7.2 110.3,7.75 110.475,7.925 v1(110.475,9.425)
  04_Bottom w0.152: v1(65.5,-0.5) 65.7,-0.5 69.7,3.5 106.3,3.5 110.475,7.675 v1(110.475,9.425)
TX_MUX_OUT: U10.8 U13.3 | length 5.4
  01_Top w0.254: U10.8@114.375,9.425 114.375,11.975 115.8,13.4 U13.3@116.65,13.4
TX_OUT: P4.1 R59.1 R77.1 U13.1 | length 20.9
  01_Top w0.254: R59.1@118.3,9.3 118.8,9.3 119.3,9.8 119.3,11.8 118.55,12.55 U13.1@118.55,13.4 118.55,14.05 119.2,14.7 119.2,18.2 118.3,19.1 R77.1@118.3,19.3 125.7,19.3 P4.1@127,18
UART_CTS: TP4.1 U1.13 U2.C6 | length 20
  01_Top w0.152: U1.13@35.6,0.635 35.665,0.7 TP4.1@37.4,0.7 38.4,1.7 38.4,6.2 40.5,8.3 43.2,8.3 43.5,8 49,8 U2.C6@49.5,8.5
UART_RTS: TP5.1 U1.11 U2.D6 | length 22.3
  01_Top w0.152: U1.11@35.6,-1.905 35.605,-1.9 TP5.1@37.4,-1.9 37.4,-0.4 38.1,0.3 38.1,0.8 38.8,1.5 38.8,6 40.7,7.9 43.1,7.9 44,7 49,7 U2.D6@49.5,7.5
UART_RXD: TP1.1 U1.2 U2.B5 | length 25.5
  01_Top w0.152: TP1.1@28.6,3.2 28.625,3.175 U1.2@30.4,3.175 32.825,3.175 33.4,2.6 37.2,2.6 37.6,3 37.6,6.6 40.1,9.1 43.1,9.1 44,10 48,10 U2.B5@48.5,9.5
UART_TXD: TP2.1 U1.3 U2.B6 | length 27.2
  01_Top w0.152: TP2.1@28.6,1.9 28.605,1.905 U1.3@30.4,1.905 32.705,1.905 33.31,1.3 37.4,1.3 38,1.9 38,6.4 40.3,8.7 43.3,8.7 43.6,9 49,9 U2.B6@49.5,9.5
USB_N: J1.A7 J1.B7 U1.6 | length 7.5
  01_Top w0.152: J1.B7@26.075,0.75 25.45,0.75 25.2,0.5 25.2,-0.1 25.35,-0.25 J1.A7@26.075,-0.25 27.75,-0.25 29.405,-1.905 U1.6@30.4,-1.905
USB_P: J1.A6 J1.B6 U1.5 | length 6.7
  01_Top w0.152: J1.B6@26.075,-0.75 27.05,-0.75 v1(27.1,-0.7) ; J1.A6@26.075,0.25 v1(27.1,0.25) 27.85,0.25 28.735,-0.635 U1.5@30.4,-0.635
  04_Bottom w0.152: v1(27.1,-0.7) v1(27.1,0.25)
VUSB: J1.A4 J1.A9 J1.B4 J1.B9 S1.1 | length 26.3
  01_Top w0.381: v1(26.5,2.4) 27.1,2.4 27.4,2.7 27.4,7.15 S1.1@30.8,10.55
  04_Bottom w0.381: v1(25.7,-2.4) v1(26.5,-2.4) 27.3,-2.4
  04_Bottom w0.762: 27.3,-2.4 28,-1.7 28,7.75 S1.1@30.8,10.55
  other v1: 25.7,2.4
pads on no net: J1.A8 J1.B8 J1.H1 J1.H2 S1.3 S1.4 S1.5 U1.9 U1.10 U1.12 U1.14 U2.A12 U2.A13 U2.A14 U2.A15 U2.A17 U2.A18 U2.AA1 U2.AA2 U2.AA7 U2.AA8 U2.AA9 U2.AA10 U2.AA12 U2.AA13 U2.AA14 U2.AA15 U2.AA17 U2.AA18 U2.AA19 U2.AA20 U2.AB7 U2.AB8 U2.AB10 U2.AB11 U2.AB12 U2.AB13 U2.AB15 U2.AB16 U2.AB17 U2.AB18 U2.AB20 U2.B3 U2.B4 U2.B7 U2.B8 U2.B11 U2.B12 U2.B13 U2.B15 U2.B16 U2.B17 U2.B18 U2.C1 U2.C2 U2.C8 U2.C11 U2.C13 U2.C14 U2.C15 U2.C16 U2.C18 U2.C19 U2.C20 U2.D3 U2.D4 U2.D7 U2.D9 U2.D12 U2.D13 U2.D17 U2.D19 U2.E1 U2.E2 U2.E7 U2.E9 U2.E10 U2.E12 U2.E14 U2.E15 U2.E16 U2.E17 U2.E19 U2.E20 U2.F7 U2.F9 U2.F10 U2.F12 U2.F13 U2.F14 U2.F15 U2.F18 U2.F19 U2.F20 U2.G1 U2.G2 U2.G6 U2.G8 U2.G10 U2.G11 U2.G12 U2.G13 U2.G15 U2.G16 U2.G17 U2.G18 U2.G20 U2.H6 U2.H8 U2.H9 U2.H10 U2.H11 U2.H13 U2.H14 U2.H15 U2.H16 U2.H18 U2.H20 U2.J1 U2.J2 U2.J7 U2.J8 U2.J9 U2.J11 U2.J13 U2.J17 U2.J18 U2.J19 U2.J21 U2.K7 U2.K9 U2.K16 U2.K17 U2.K19 U2.K20 U2.L1 U2.L2 U2.L7 U2.L8 U2.L9 U2.L17 U2.L18 U2.L19 U2.L20 U2.M6 U2.M7 U2.M8 U2.M9 U2.M16 U2.M18 U2.M20 U2.M21 U2.N1 U2.N2 U2.N6 U2.N8 U2.N9 U2.N16 U2.N19 U2.N20 U2.N21 U2.P6 U2.P7 U2.P8 U2.P9 U2.P12 U2.P14 U2.P16 U2.P17 U2.P18 U2.P19 U2.R1 U2.R2 U2.R5 U2.R6 U2.R7 U2.R9 U2.R10 U2.R11 U2.R12 U2.R14 U2.R15 U2.R16 U2.R17 U2.R20 U2.T9 U2.T10 U2.T12 U2.T13 U2.T14 U2.T15 U2.T17 U2.T18 U2.T19 U2.T20 U2.U1 U2.U2 U2.U6 U2.U10 U2.U11 U2.U12 U2.U13 U2.U15 U2.U16 U2.U17 U2.U20 U2.V6 U2.V9 U2.V10 U2.V11 U2.V13 U2.V14 U2.V15 U2.V16 U2.V18 U2.V19 U2.V20 U2.V21 U2.W1 U2.W2 U2.W19 U2.W21 U2.Y3 U2.Y4 U2.Y6 U2.Y7 U2.Y9 U2.Y10 U2.Y11 U2.Y12 U2.Y14 U2.Y15 U2.Y16 U2.Y17 U2.Y19 U2.Y20 U8.A2 U8.A3 U8.A5 U8.B1 U8.B5 U8.C1 U8.C3 U8.C5 U8.D1 U8.D5 U8.E1 U8.E2 U8.E3 U8.E4 U8.E5 U9.25 U19.3 U19.7 U20.3 U20.7 U21.3 U23.3 U23.7 U24.3 U24.7 Y1.1

## Polygon pours and split planes (outlines as drawn)
AGND on 02_Plane (split plane): 134.271,23.846 134.271,11.454 133.546,10.729 126.1,10.729 126.05,10.72 126.008,10.692 124.008,8.692 123.98,8.65 123.971,8.6 123.971,-9 123.98,-9.05 124.008,-9.092 125.608,-10.692 125.65,-10.72 125.7,-10.729 134.246,-10.729 134.871,-11.354 134.871,-24.946 134.546,-25.271 130.354,-25.271 130.292,-25.208 130.25,-25.18 130.2,-25.171 130.15,-25.18 130.108,-25.208 130.1,-25.217 125.392,-20.508 125.35,-20.48 125.3,-20.471 74.754,-20.471 74.329,-20.046 74.329,-14.954 74.454,-14.829 76.8,-14.829 76.85,-14.82 76.892,-14.792 77.792,-13.892 77.82,-13.85 77.829,-13.8 77.829,-9.854 78.154,-9.529 78.9,-9.529 78.95,-9.52 78.992,-9.492 79.02,-9.45 79.029,-9.4 79.029,-7.929 80.8,-7.929 80.85,-7.92 80.892,-7.892 81.092,-7.692 81.12,-7.65 81.129,-7.6 81.129,-6.8 81.129,-6.5 81.12,-6.45 81.092,-6.408 80.629,-5.946 80.629,-4.8 80.62,-4.75 80.592,-4.708 79.292,-3.408 79.25,-3.38 79.2,-3.371 78.454,-3.371 76.029,-0.946 76.029,-0.6 76.029,4.771 84.4,4.771 84.45,4.78 84.492,4.808 84.52,4.85 84.529,4.9 84.529,14.271 87,14.271 87.05,14.28 87.092,14.308 87.12,14.35 87.129,14.4 87.129,14.7 87.129,18.171 91.6,18.171 91.65,18.18 91.692,18.208 91.72,18.25 91.729,18.3 91.729,20.471 124.9,20.471 124.95,20.48 124.992,20.508 129.654,25.171 132.946,25.171
GND on 02_Plane (split plane): 136.249,29.483 136.497,29.456 136.742,29.412 136.984,29.35 137.22,29.272 137.45,29.176 137.673,29.065 137.888,28.937 138.092,28.795 138.287,28.639 138.469,28.469 138.639,28.287 138.795,28.092 138.937,27.888 139.065,27.673 139.176,27.45 139.272,27.22 139.35,26.984 139.412,26.742 139.456,26.497 139.483,26.249 139.491,26.016 139.49,26 139.49,-26 139.491,-26.016 139.483,-26.249 139.456,-26.497 139.412,-26.742 139.35,-26.984 139.272,-27.22 139.176,-27.45 139.065,-27.673 138.937,-27.888 138.795,-28.092 138.639,-28.287 138.469,-28.469 138.287,-28.639 138.092,-28.795 137.888,-28.937 137.673,-29.065 137.45,-29.176 137.22,-29.272 136.984,-29.35 136.742,-29.412 136.497,-29.456 136.249,-29.483 136.016,-29.491 136,-29.49 24,-29.49 23.984,-29.491 23.751,-29.483 23.503,-29.456 23.258,-29.412 23.016,-29.35 22.78,-29.272 22.55,-29.176 22.327,-29.065 22.112,-28.937 21.908,-28.795 21.713,-28.639 21.531,-28.469 21.361,-28.287 21.205,-28.092 21.063,-27.888 20.935,-27.673 20.824,-27.45 20.728,-27.22 20.65,-26.984 20.588,-26.742 20.544,-26.497 20.517,-26.249 20.509,-26.016 20.51,-26 20.51,26 20.509,26.016 20.517,26.249 20.544,26.497 20.588,26.742 20.65,26.984 20.728,27.22 20.824,27.45 20.935,27.673 21.063,27.888 21.205,28.092 21.361,28.287 21.531,28.469 21.713,28.639 21.908,28.795 22.112,28.937 22.327,29.065 22.55,29.176 22.78,29.272 23.016,29.35 23.258,29.412 23.503,29.456 23.751,29.483 23.984,29.491 24,29.49 136,29.49 136.016,29.491
3V3 on 03_Plane (split plane): 91.522,18.378 87,18.378 86.97,18.372 86.945,18.355 86.928,18.33 86.922,18.3 86.922,14.478 84.478,14.478 84.478,20.422 91.522,20.422
A3V3 on 03_Plane (split plane): 91.522,6.932 88.045,3.455 88.028,3.43 88.022,3.4 88.022,0.5 88.022,-1.768 86.668,-3.122 79.5,-3.122 79.47,-3.128 79.445,-3.145 79.168,-3.422 78.432,-3.422 77.855,-2.845 75.978,-0.968 75.978,2 75.978,4.822 84.4,4.822 84.43,4.828 84.455,4.845 84.472,4.87 84.478,4.9 84.478,14.322 87,14.322 87.03,14.328 87.055,14.345 87.072,14.37 87.078,14.4 87.078,18.222 91.522,18.222
2V5 on 03_Plane (split plane): 74.322,1.2 74.328,1.17 74.345,1.145 74.37,1.128 74.4,1.122 75.822,1.122 75.822,-1 75.828,-1.03 75.845,-1.055 77.612,-2.822 67.5,-2.822 67.47,-2.828 67.445,-2.845 65.368,-4.922 60.078,-4.922 60.078,-3 60.078,1.922 74.322,1.922
+A2V7 on 03_Plane (split plane): 134.322,23.868 134.322,11.432 133.568,10.678 126.1,10.678 126.07,10.672 126.045,10.655 124.045,8.655 124.028,8.63 124.022,8.6 124.022,8.5 124.022,-9 124.028,-9.03 124.045,-9.055 125.645,-10.655 125.67,-10.672 125.7,-10.678 134.268,-10.678 134.922,-11.332 134.922,-24.968 134.568,-25.322 130.132,-25.322 125.355,-20.545 125.33,-20.528 125.3,-20.522 80.778,-20.522 80.778,-16.432 82.932,-14.278 95.7,-14.278 95.73,-14.272 95.755,-14.255 95.855,-14.155 95.872,-14.13 95.878,-14.1 95.878,-3.278 98.3,-3.278 98.33,-3.272 98.355,-3.255 98.372,-3.23 98.378,-3.2 98.378,3.4 98.372,3.43 98.355,3.455 98.33,3.472 98.3,3.478 88.288,3.478 91.655,6.845 91.672,6.87 91.678,6.9 91.678,18.3 91.678,20.422 124.8,20.422 124.83,20.428 124.855,20.445 124.955,20.545 129.632,25.222 132.968,25.222
A4V5 on 03_Plane (split plane): 98.222,-3.122 95.8,-3.122 95.77,-3.128 95.745,-3.145 95.728,-3.17 95.722,-3.2 95.722,-14.068 95.668,-14.122 82.9,-14.122 82.87,-14.128 82.845,-14.145 80.645,-16.345 80.628,-16.37 80.622,-16.4 80.622,-20.522 74.732,-20.522 74.278,-20.068 74.278,-14.778 76.8,-14.778 76.83,-14.772 76.855,-14.755 77.755,-13.855 77.772,-13.83 77.778,-13.8 77.778,-9.832 78.132,-9.478 78.8,-9.478 78.83,-9.472 78.855,-9.455 78.955,-9.355 78.972,-9.33 78.978,-9.3 78.978,-7.778 80.8,-7.778 80.83,-7.772 80.855,-7.755 81.055,-7.555 81.072,-7.53 81.078,-7.5 81.078,-6.5 81.072,-6.47 81.055,-6.445 80.578,-5.968 80.578,-4.9 80.578,-4.8 80.572,-4.77 80.555,-4.745 79.31,-3.5 79.532,-3.278 86.7,-3.278 86.73,-3.272 86.755,-3.255 88.155,-1.855 88.172,-1.83 88.178,-1.8 88.178,0.5 88.178,3.322 98.222,3.322
2V5 on 03_Plane (split plane): 63.322,-14.7 63.322,-22.722 57.078,-22.722 57.078,-16.2 57.072,-16.17 57.055,-16.145 55.705,-14.795 55.68,-14.778 55.65,-14.772 50.138,-14.772 51.432,-13.478 57,-13.478 57.03,-13.472 57.055,-13.455 57.072,-13.43 57.078,-13.4 57.078,-12.478 63.322,-12.478
1V1 on 03_Plane (split plane): 53.922,19.032 47.945,13.055 47.928,13.03 47.922,13 47.922,3 47.928,2.97 47.945,2.945 47.97,2.928 48,2.922 59.922,2.922 59.922,-2.922 41.578,-2.922 41.578,22.422 53.922,22.422
3V3 on 03_Plane (split plane): 68.945,20.445 68.97,20.428 69,20.422 81.222,20.422 81.222,6.578 74.4,6.578 74.37,6.572 74.345,6.555 74.328,6.53 74.322,6.5 74.322,2.078 60.078,2.078 60.078,3 60.072,3.03 60.055,3.055 60.03,3.072 60,3.078 48.078,3.078 48.078,12.968 54.055,18.945 54.072,18.97 54.078,19 54.078,22.422 66.968,22.422
3V3 on 03_Plane (split plane): 41.422,-3 41.428,-3.03 41.445,-3.055 41.47,-3.072 41.5,-3.078 50.922,-3.078 50.922,-8 50.928,-8.03 50.945,-8.055 50.97,-8.072 51,-8.078 51.922,-8.078 51.922,-9.922 51,-9.922 50.97,-9.928 50.945,-9.945 50.928,-9.97 50.922,-10 50.922,-10.668 50.168,-11.422 43.578,-11.422 43.578,-8.3 43.572,-8.27 43.555,-8.245 43.53,-8.228 43.5,-8.222 26.578,-8.222 26.578,-5.332 27.955,-3.955 27.972,-3.93 27.978,-3.9 27.978,5.168 34.232,11.422 41.422,11.422
5V on 03_Plane (split plane): 136.249,29.483 136.497,29.456 136.742,29.412 136.984,29.35 137.22,29.272 137.45,29.176 137.673,29.065 137.888,28.937 138.092,28.795 138.287,28.639 138.469,28.469 138.639,28.287 138.795,28.092 138.937,27.888 139.065,27.673 139.176,27.45 139.272,27.22 139.35,26.984 139.412,26.742 139.456,26.497 139.483,26.249 139.491,26.016 139.49,26 139.49,-26 139.491,-26.016 139.483,-26.249 139.456,-26.497 139.412,-26.742 139.35,-26.984 139.272,-27.22 139.176,-27.45 139.065,-27.673 138.937,-27.888 138.795,-28.092 138.639,-28.287 138.469,-28.469 138.287,-28.639 138.092,-28.795 137.888,-28.937 137.673,-29.065 137.45,-29.176 137.22,-29.272 136.984,-29.35 136.742,-29.412 136.497,-29.456 136.249,-29.483 136.016,-29.491 136,-29.49 24,-29.49 23.984,-29.491 23.751,-29.483 23.503,-29.456 23.258,-29.412 23.016,-29.35 22.78,-29.272 22.55,-29.176 22.327,-29.065 22.112,-28.937 21.908,-28.795 21.713,-28.639 21.531,-28.469 21.361,-28.287 21.205,-28.092 21.063,-27.888 20.935,-27.673 20.824,-27.45 20.728,-27.22 20.65,-26.984 20.588,-26.742 20.544,-26.497 20.517,-26.249 20.509,-26.016 20.51,-26 20.51,26 20.509,26.016 20.517,26.249 20.544,26.497 20.588,26.742 20.65,26.984 20.728,27.22 20.824,27.45 20.935,27.673 21.063,27.888 21.205,28.092 21.361,28.287 21.531,28.469 21.713,28.639 21.908,28.795 22.112,28.937 22.327,29.065 22.55,29.176 22.78,29.272 23.016,29.35 23.258,29.412 23.503,29.456 23.751,29.483 23.984,29.491 24,29.49 136,29.49 136.016,29.491
1V8 on 03_Plane (split plane): 78.345,-3.555 78.37,-3.572 78.4,-3.578 79.168,-3.578 80.422,-4.832 80.422,-4.9 80.422,-6 80.428,-6.03 80.445,-6.055 80.922,-6.532 80.922,-7.468 80.768,-7.622 78.9,-7.622 78.87,-7.628 78.845,-7.645 78.828,-7.67 78.822,-7.7 78.822,-9.268 78.768,-9.322 78.1,-9.322 78.07,-9.328 78.045,-9.345 77.645,-9.745 77.628,-9.77 77.622,-9.8 77.622,-13.768 76.768,-14.622 63.478,-14.622 63.478,-12.4 63.472,-12.37 63.455,-12.345 63.43,-12.328 63.4,-12.322 57,-12.322 56.97,-12.328 56.945,-12.345 56.928,-12.37 56.922,-12.4 56.922,-13.322 51.4,-13.322 51.37,-13.328 51.345,-13.345 48.445,-16.245 48.428,-16.27 48.422,-16.3 48.422,-22.922 43.578,-22.922 43.578,-11.578 50.2,-11.578 50.23,-11.572 50.255,-11.555 51.055,-10.755 51.072,-10.73 51.078,-10.7 51.078,-10.078 52,-10.078 52.03,-10.072 52.055,-10.055 52.072,-10.03 52.078,-10 52.078,-8 52.072,-7.97 52.055,-7.945 52.03,-7.928 52,-7.922 51.078,-7.922 51.078,-3.078 59.922,-3.078 59.922,-5 59.928,-5.03 59.945,-5.055 59.97,-5.072 60,-5.078 65.4,-5.078 65.43,-5.072 65.455,-5.055 67.532,-2.978 77.768,-2.978
3V3_PGM on 03_Plane (split plane): 43.422,-11.5 43.422,-18.522 23.678,-18.522 23.678,-12.132 26.555,-9.255 26.572,-9.23 26.578,-9.2 26.578,-8.378 43.422,-8.378

## Other copper
01_Top:
  region net 2V5: 60.9,-21.3 57,-21.3 57,-22.3 60.9,-22.3
  region net 1V8: 47.8,-21.3 43.9,-21.3 43.9,-22.3 47.8,-22.3
  rectangle net 3V3: 62.3,21.1 66.2,22.1
  rectangle net 5V: 28,26.9 36.3,28.5
  rectangle net GND: 73.6,-1 75.5,1
  rectangle net AGND: 76.3,-1 78.2,1
  rectangle net 1V1: 43.8,21.1 47.7,22.1
  region net 5V: 64.3,-26.6 64.3,-25.4 65.9,-23.8 66.4,-23.8 66.4,-25.8 65.8,-25.8 65,-26.6
  region net NetL3_1: 62.1,-26.6 62.1,-25.3 56.6,-25.3 56.6,-27.1 60.8,-27.1 61.3,-26.6
  region net 5V: 51.2,-26.6 51.2,-25.4 52.8,-23.8 53.3,-23.8 53.3,-25.8 52.7,-25.8 51.9,-26.6
  region net NetL2_1: 49,-26.6 49,-25.3 43.5,-25.3 43.5,-27.1 47.7,-27.1 48.2,-26.6
  region net 5V: 58.9,26.4 58.9,25.2 57.3,23.6 56.8,23.6 56.8,25.6 57.4,25.6 58.2,26.4
  region net NetL4_1: 61.1,26.4 61.1,25.1 66.6,25.1 66.6,26.9 62.4,26.9 61.9,26.4
  region net A3V3: 81.3,2.8 81.3,1.6 83,1.6 83,0.8 82.9,0.7 81.3,0.7 81.2,0.6 81.2,0.2 79.1,0.2 79.1,2.8
  region net A4V5: 91.6,2.8 91.6,1.6 93.3,1.6 93.3,0.8 93.2,0.7 91.6,0.7 91.5,0.6 91.5,0.2 89.4,0.2 89.4,2.8
  region net +A2V7: 102.1,2.8 102.1,1.6 103.8,1.6 103.8,0.8 103.7,0.7 102.1,0.7 102,0.6 102,0.2 99.9,0.2 99.9,2.8
  region net -A2V7: 112.8,2.8 112.8,1.6 114.5,1.6 114.5,0.8 114.4,0.7 112.8,0.7 112.7,0.6 112.7,0.2 110.6,0.2 110.6,2.8
  region net NetL1_1: 42.6,26.4 42.6,25.1 48.1,25.1 48.1,26.9 43.9,26.9 43.4,26.4
  region net 5V: 40.4,26.4 40.4,25.2 38.8,23.6 38.3,23.6 38.3,25.6 38.9,25.6 39.7,26.4
02_Plane (plane layer: these items are gaps in the copper):
  lines w0.254: 74.2,-20.1 74.2,-14.9 74.4,-14.7 76.8,-14.7 77.7,-13.8 77.7,-9.8 78.1,-9.4 78.9,-9.4 78.9,-7.8 80.8,-7.8 81,-7.6 81,-6.8 81,-6.5 80.5,-6 80.5,-4.8 79.2,-3.5 78.4,-3.5 75.9,-1 75.9,-0.6 75.9,4.9 84.4,4.9 84.4,14.4 87,14.4 87,14.7 87,18.3 91.6,18.3 91.6,20.6 124.9,20.6 129.6,25.3 133,25.3 134.4,23.9 134.4,11.4 133.6,10.6 126.1,10.6 124.1,8.6 124.1,-9 125.7,-10.6 134.3,-10.6 135,-11.3 135,-25 134.6,-25.4 130.3,-25.4 130.2,-25.3 130.1,-25.4 125.3,-20.6 74.7,-20.6 74.2,-20.1
03_Plane (plane layer: these items are gaps in the copper):
  lines w0.152: 41.5,11.5 34.2,11.5 27.9,5.2 27.9,-3.9 26.5,-5.3 26.5,-8.3 ; 43.5,-18.6 23.6,-18.6 23.6,-12.1 26.5,-9.2 26.5,-8.3 ; 49.95,-14.85 55.65,-14.85 57,-16.2 57,-22.8 63.4,-22.8 63.4,-14.7 ; 51,-3 51,-8 52,-8 52,-10 51,-10 51,-10.7 50.2,-11.5 43.5,-11.5 ; 60,2 74.4,2 ; 71,20.5 69,20.5 ; 74.2,-14.7 74.2,-20.1 74.7,-20.6 125.3,-20.6 ; 75.9,1.2 74.4,1.2 74.4,2 ; 80.7,-20.6 80.7,-16.4 82.9,-14.2 95.7,-14.2 95.8,-14.1 95.8,-3.2 98.3,-3.2 98.3,3.4 88.1,3.4 ; 26.5,-8.3 43.5,-8.3 43.5,-11.5 ; 43.5,-11.5 43.5,-23 48.5,-23 48.5,-16.3 51.4,-13.4 57,-13.4 57,-12.4 63.4,-12.4 63.4,-14.7 ; 54,22.5 41.5,22.5 41.5,-3 43.5,-3 60,-3 ; 54,22.5 54,19 48,13 48,3 60,3 60,-3 ; 54,22.5 67,22.5 69,20.5 ; 60,-3 60,-5 65.4,-5 67.5,-2.9 77.8,-2.9 ; 63.4,-14.7 76.8,-14.7 77.7,-13.8 77.7,-9.8 78.1,-9.4 78.8,-9.4 78.9,-9.3 78.9,-7.7 80.8,-7.7 81,-7.5 81,-6.5 80.5,-6 80.5,-4.9 80.5,-4.8 79.2,-3.5 ; 69,20.5 81.3,20.5 81.3,6.5 74.4,6.5 74.4,2 ; 77.8,-2.9 78.4,-3.5 79.2,-3.5 ; 77.8,-2.9 75.9,-1 75.9,2 75.9,4.9 84.4,4.9 84.4,14.4 ; 79.2,-3.5 79.5,-3.2 86.7,-3.2 88.1,-1.8 88.1,0.5 88.1,3.4 ; 84.4,14.4 84.4,20.5 124.8,20.5 ; 84.4,14.4 87,14.4 87,18.3 91.6,18.3 ; 88.1,3.4 91.6,6.9 91.6,18.3 ; 91.6,18.3 91.6,20.5 124.8,20.5 ; 124.8,20.5 124.9,20.6 129.6,25.3 133,25.3 134.4,23.9 134.4,11.4 133.6,10.6 126.1,10.6 124.1,8.6 124.1,8.5 124.1,-9 125.7,-10.6 134.3,-10.6 ; 125.3,-20.6 125.3,-20.6 ; 125.3,-20.6 130.1,-25.4 134.6,-25.4 135,-25 135,-11.3 134.3,-10.6 ; 134.3,-10.6 134.3,-10.6

## Silkscreen, mask and mechanical layers (free items; w line width, h text height)
Top Overlay:
  rectangle: 125,7.5 128,8.5
  rectangle: 135,7.5 138,8.5
  region: 129,-7.5 126,-7.5 126,-8.5 129,-8.5
  region: 139,-7.5 136,-7.5 136,-8.5 139,-8.5
  region: 127.5,9.5 127.5,6.5 129,8
  region: 137.5,9.5 137.5,6.5 139,8
  region: 126.5,-9.5 126.5,-6.5 125,-8
  region: 136.5,-9.5 136.5,-6.5 135,-8
  lines w0.152: 130.8,-5.5 131.4,-5.5 ; 130.8,-5 131.4,-5 ; 130.8,4.7 131.4,4.7 ; 130.8,5.2 131.4,5.2 ; 131.1,-5.3 131.1,-4.7 ; 131.1,4.9 131.1,5.5
  text "TX Gain" at 98.7,25.9 h1.5
  text "5V" at 36,25.6 h0.76 r90
  text "TX FLT. ON" at 76.3,24.6 h1
  text "0dB" at 94.1,24.4 h0.76
  text "-6dB" at 98.7,24.4 h0.76
  text "-12dB" at 103.4,24.4 h0.76
  text "-18dB" at 108.5,24.4 h0.76
  text "OFF" at 27.1,21.6 h1.5
  text "1V1" at 46.1,21.2 h0.76
  text "3V3" at 64.4,21.2 h0.76
  text "-5V" at 68.3,20.6 h0.76
  text "CHIRP" at 36.8,18.8 h0.76
  text "A1" at 109.6,18.2 h0.76 r90
  text "A2" at 110.7,18.2 h0.76 r90
  text "1/1F" at 111.8,18 h0.76 r90
  text "1/2F" at 112.9,18 h0.76 r90
  text "1/4F" at 114,18 h0.76 r90
  text "1/8F" at 115.1,18 h0.76 r90
  text "DACLK" at 72.5,16.8 h0.76
  text "PS-25-001-E-01-A0" at 49,15.4 h0.76
  text "STATE" at 36.8,14.4 h0.76
  text "MEGAPHASE" at 51.9,14 h0.76
  text "F" at 99.5,13.1 h0.76
  text "P" at 92.5,12.8 h0.76
  text "G" at 94.8,11.7 h0.76
  text "N" at 92.5,10.6 h0.76
  text "PWR" at 36.9,9.7 h0.76
  text "ON" at 27,7.4 h1.5
  text "TX" at 129.8,6.4 h3
  text "G" at 107.3,5.6 h0.76
  text "A0" at 109.6,5 h0.76 r90
  text "EN" at 110.7,5 h0.76 r90
  text "1/1" at 111.8,4.8 h0.76 r90
  text "1/2" at 112.9,4.8 h0.76 r90
  text "1/4" at 114,4.8 h0.76 r90
  text "1/8" at 115.1,4.8 h0.76 r90
  text "FS =   1V @ 0dB" at 127.4,4.7 h0.76
  text "-" at 136.7,0.6 h1.5 r90
  text "A3V3" at 78.7,-1.3 h0.76 r90
  text "A4V5" at 89,-1.3 h0.76 r90
  text "-A2V7" at 110.2,-1.7 h0.76 r90
  text "+A2V7" at 99.5,-1.8 h0.76 r90
  text "+" at 135.4,-1.9 h1.5
  text "5V OUT" at 138.4,-3.2 h1.2 r90
  text "FS =   1V @ 0dB" at 127.4,-5.5 h0.76
  text "USB" at 21.3,-6.2 h0.76
  text "G" at 97.9,-6.4 h0.76 r90
  text "A1" at 99.5,-6.5 h0.76 r90
  text "A2" at 100.6,-6.5 h0.76 r90
  text "1/1F" at 101.7,-6.7 h0.76 r90
  text "1/2F" at 102.8,-6.7 h0.76 r90
  text "1/4F" at 103.9,-6.7 h0.76 r90
  text "1/8F" at 105,-6.7 h0.76 r90
  text "P" at 82,-7.6 h0.76
  text "ACT" at 29.4,-7.8 h0.76
  text "ADRDY" at 69.9,-8.8 h0.76
  text "G" at 81.9,-9.2 h0.76
  text "RX" at 129.9,-9.4 h3
  text "ADCLK" at 69.9,-9.8 h0.76
  text "ADSTR" at 69.9,-10.8 h0.76
  text "N" at 81.9,-10.9 h0.76
  text "IN" at 122.9,-13.9 h0.76
  text "R2V5" at 84.1,-15.8 h0.76
  text "Designed by W.D." at 50.5,-17.5 h0.76
  text "M" at 96.4,-18.8 h0.76
  text "2025.2" at 53,-18.9 h0.76
  text "A" at 93.7,-19.7 h0.76
  text "A0" at 99.5,-19.7 h0.76 r90
  text "EN" at 100.6,-19.7 h0.76 r90
  text "1/1" at 101.7,-19.9 h0.76 r90
  text "1/2" at 102.8,-19.9 h0.76 r90
  text "1/4" at 103.9,-19.9 h0.76 r90
  text "1/8" at 105,-19.9 h0.76 r90
  text "PGM" at 21.3,-20.6 h0.76
  text "2V5" at 56.9,-22.2 h0.76
  text "1V8" at 43.9,-22.3 h0.76
  text "TEMP" at 35.5,-22.9 h0.76
  text "18dB" at 93.8,-25.1 h0.76
  text "12dB" at 98.7,-25.1 h0.76
  text "6dB" at 104.1,-25.1 h0.76
  text "0dB" at 109.1,-25.1 h0.76
  text "RX FLT. ON" at 76.2,-25.6 h1
  text "RX Gain" at 98.8,-27.3 h1.5
Mechanical 1:
  the board outline again, w0.127